# Altium PCB SBC_PCB.PcbDoc (part 1 of 4)
Units mm, origin at the board's own origin, x right, y up, seen from the top; angles counter-clockwise.
Board outline 85 x 56 mm, 8 copper layers (L1(SIG), L2(GND), L3(PWR), L4(SIG), L5(GND), L6(SIG), L7(GND), L8(SIG)), stack 1.593 mm thick; 597 components, 497 nets, 2394 pads, 229 vias.
Unrouted connection lines stored in the file: 1459.
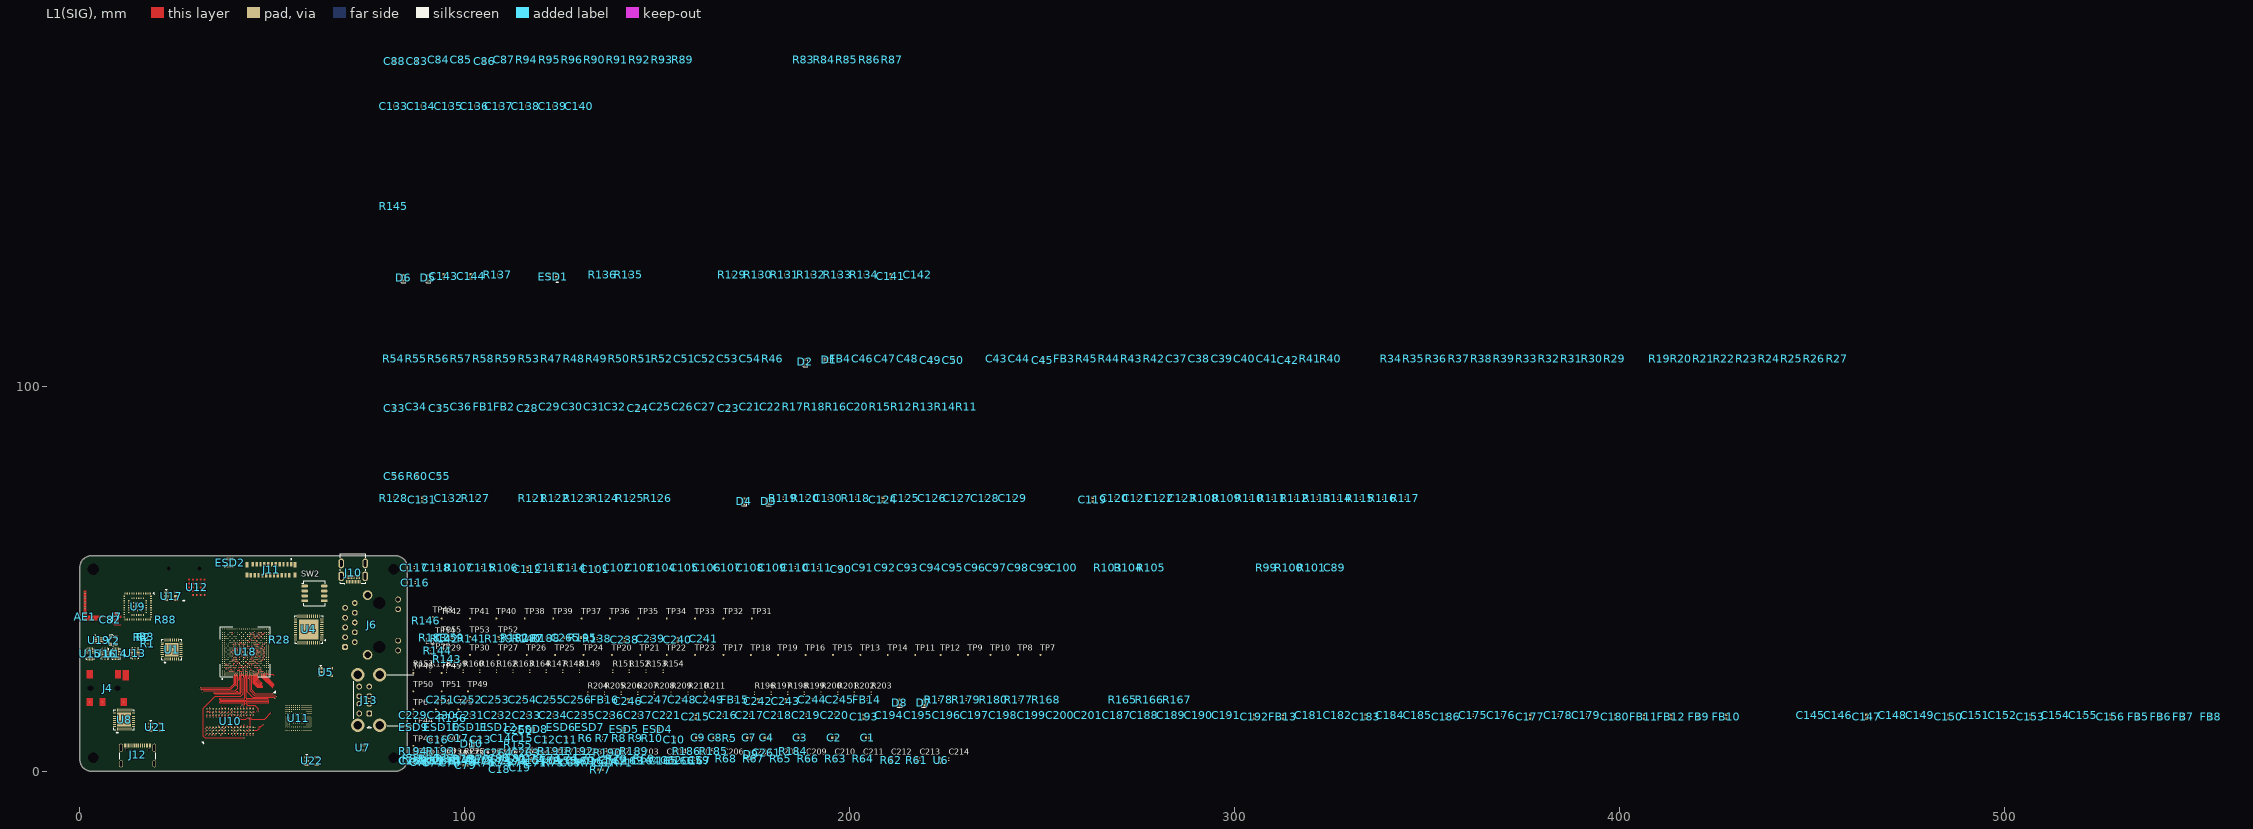
[diagram p0: L1(SIG) view]
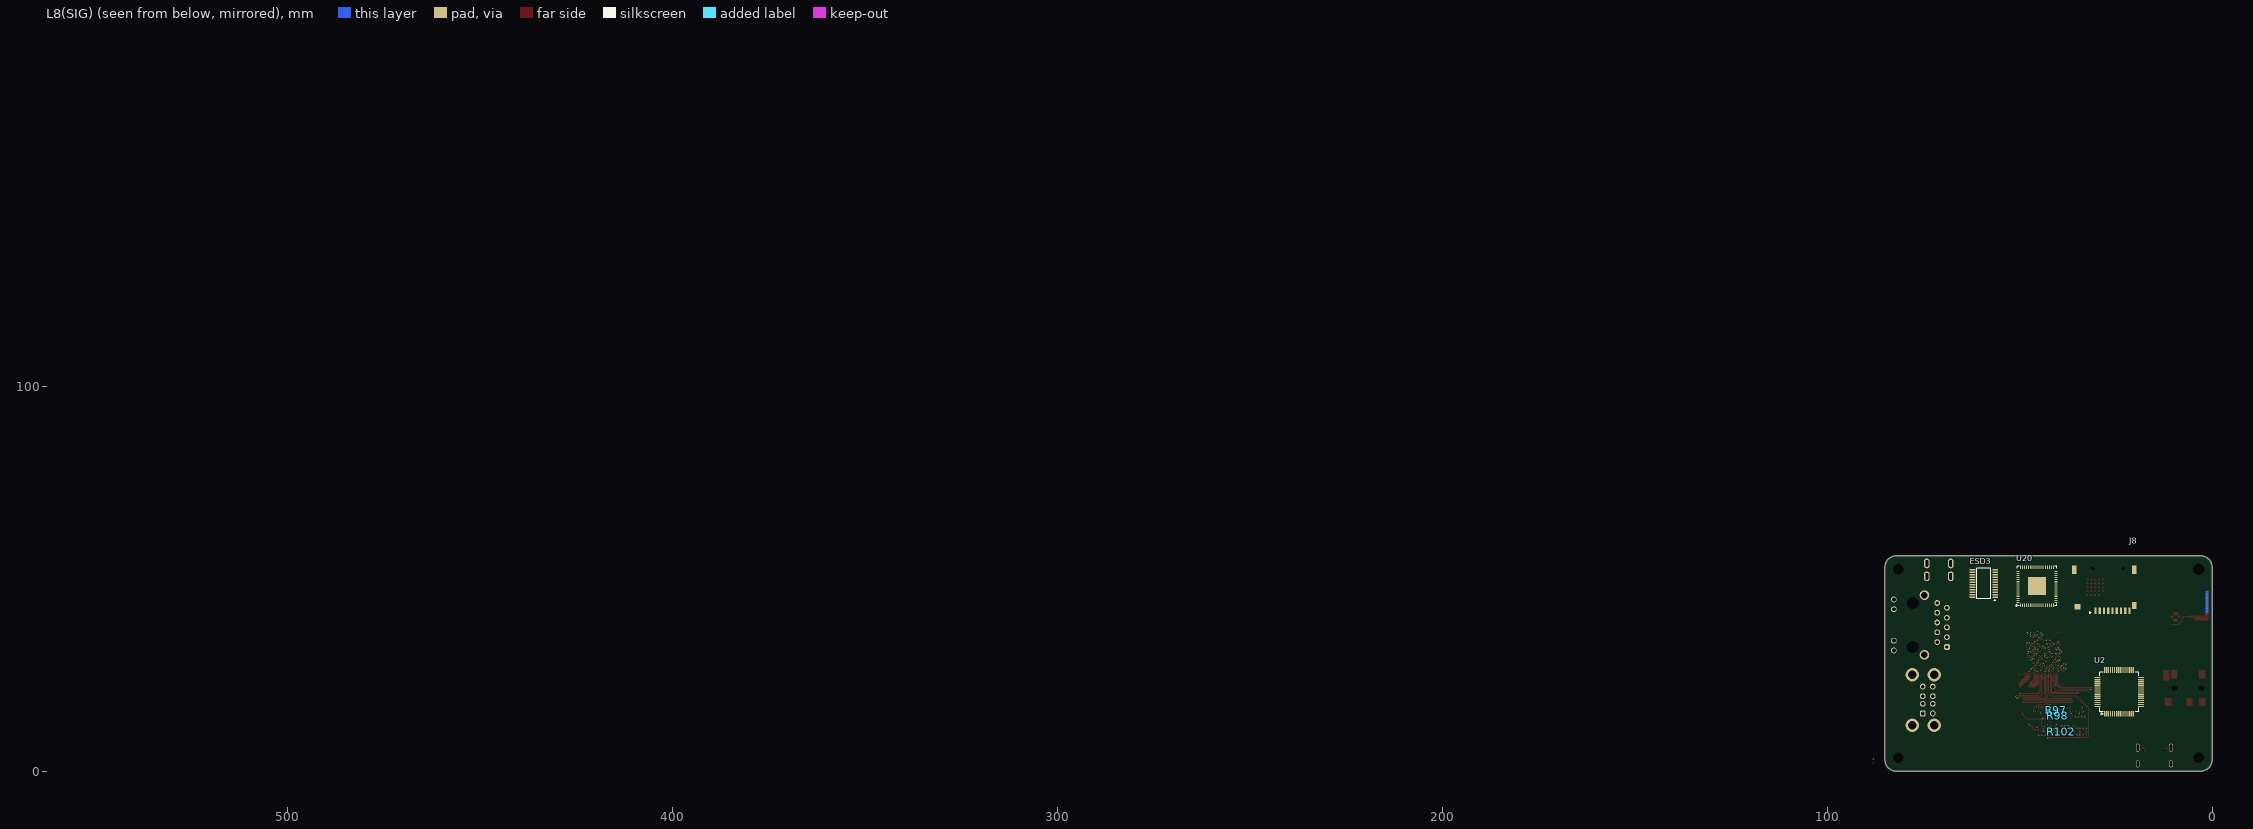
[diagram p1: L8(SIG) view, seen from below]
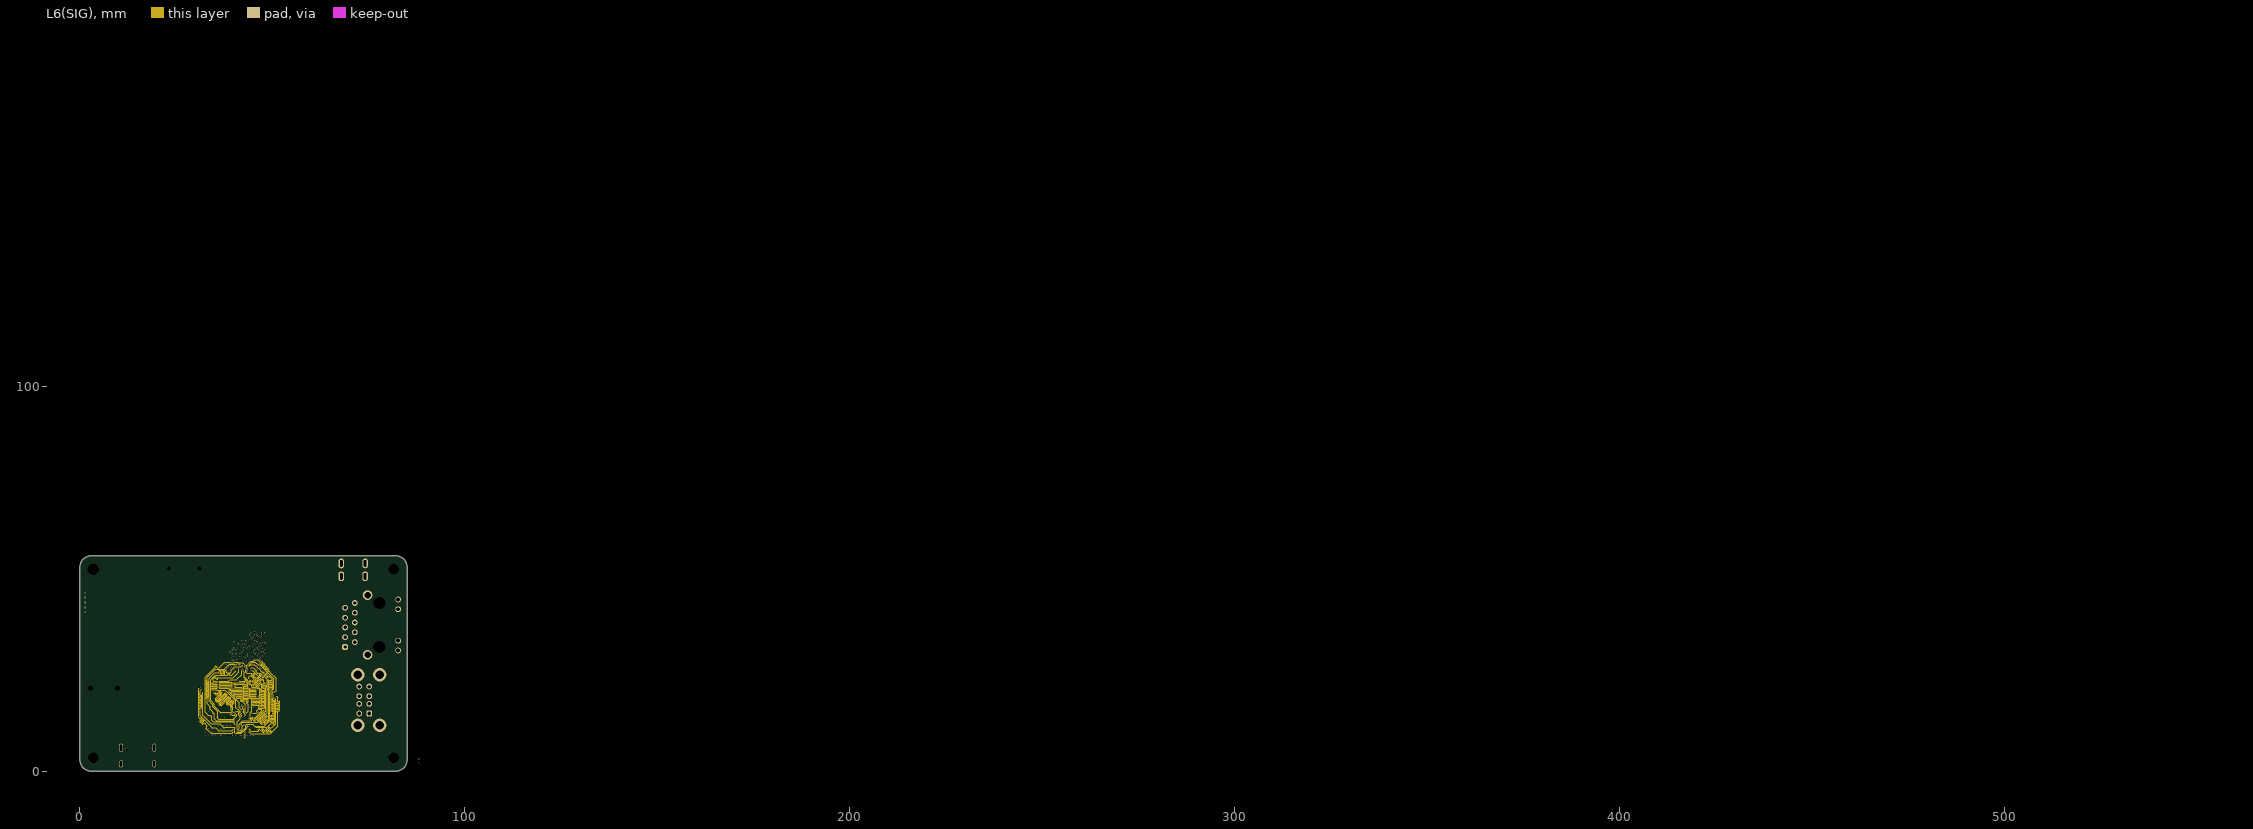
[diagram p2: L6(SIG)]

## Layer stack, top to bottom
Top Solder: solder mask 0.0305, Solder Resist, Dk 3.8
L1(SIG): signal copper 0.035
Dielectric 1: prepreg 0.069, 1080, Dk 3.91
L2(GND): signal copper 0.03
Dielectric 2: core 0.075, FR-4, Dk 3.99
L3(PWR): signal copper 0.03
Dielectric 3: prepreg 0.203, 7628, Dk 4.4
Dielectric 4: prepreg 0.218, 7628, Dk 4.4
Dielectric 5: prepreg 0.069, 1080, Dk 3.91
L4(SIG): signal copper 0.03
Dielectric 6: core 0.075, 7628, Dk 3.99
L5(GND): signal copper 0.03
Dielectric 7: prepreg 0.069, 1080, Dk 3.91
Dielectric 8: prepreg 0.218, 7628, Dk 4.4
Dielectric 9: prepreg 0.203, 7628, Dk 4.4
L6(SIG): signal copper 0.03
Dielectric 10: core 0.075, FR-4, Dk 3.99
L7(GND): signal copper 0.03
Dielectric 11: prepreg 0.069, 1080, Dk 3.91
L8(SIG): signal copper 0.035
Bottom Solder: solder mask 0.0305, Solder Resist, Dk 3.8

## Board outline
0,3 0,53 cw(c3,53) 3,56 82,56 cw(c82,53) 85,53 85,3 cw(c82,3) 82,0 3,0 cw(c3,3)

## Design rules (kind name [scope] priority, off if disabled: settings)
Clearance Clearance_BGA [TouchesRoom('ROOM_SOC') and IsTrack and OnLayer('L1(SIG)')] p1: gap=0.086 ignorepadtopadclearanceinfootprint=FALSE
Clearance ClearanceDDR4 [(InNetClass('DDR4_CTRL') OR InNetClass('DDR4_BYTE0') OR InNetClass('DDR4_BYTE1')) and not InAnyDifferentialPair] p2: gap=0.1 ignorepadtopadclearanceinfootprint=FALSE except(0.15: Arc-Arc Arc-Track Track-Track; 0.2: Via-Via)
Clearance [All] p3: gap=0.1 ignorepadtopadclearanceinfootprint=FALSE except(0.15: SMDPad-SMDPad; 0.2: Arc-Hole Track-Hole Via-Via)
DiffPairsRouting DiffPairsUnderBGA [TouchesRoom('ROOM_SOC')] p1: maxlimit=0.254 minlimit=0.086 mostfreqgap=0.086 toplayer_minwidth=0.076 toplayer_maxwidth=0.381 toplayer_prefwidth=0.076 midlayer1_minwidth=0.076 midlayer1_maxwidth=0.381 midlayer1_prefwidth=0.076 midlayer2_minwidth=0.076 midlayer2_maxwidth=0.381 midlayer2_prefwidth=0.076 midlayer5_minwidth=0.076 midlayer5_maxwidth=0.381 midlayer5_prefwidth=0.076 midlayer6_minwidth=0.076 midlayer6_maxwidth=0.381 midlayer6_prefwidth=0.076 midlayer7_minwidth=0.076 midlayer7_maxwidth=0.381 midlayer7_prefwidth=0.076 midlayer8_minwidth=0.076 midlayer8_maxwidth=0.381 midlayer8_prefwidth=0.076 bottomlayer_minwidth=0.076 bottomlayer_maxwidth=0.381 bottomlayer_prefwidth=0.076 maxuncoupledlength=12.7
DiffPairsRouting Diff85 [InDifferentialPairClass('DIFF85')] p2: maxlimit=0.305 minlimit=0.13 mostfreqgap=0.305 toplayer_maxgap=0.13 toplayer_prefgap=0.13 toplayer_minwidth=0.11 toplayer_maxwidth=0.11 toplayer_prefwidth=0.11 midlayer5_mingap=0.2 midlayer5_maxgap=0.2 midlayer5_prefgap=0.2 midlayer5_minwidth=0.1 midlayer5_maxwidth=0.1 midlayer5_prefwidth=0.1 midlayer7_mingap=0.2 midlayer7_maxgap=0.2 midlayer7_prefgap=0.2 midlayer7_minwidth=0.1 midlayer7_maxwidth=0.1 midlayer7_prefwidth=0.1 bottomlayer_maxgap=0.13 bottomlayer_prefgap=0.13 bottomlayer_minwidth=0.11 bottomlayer_maxwidth=0.11 bottomlayer_prefwidth=0.11 impedanceprofiledriven=TRUE impedanceprofileid={BB598DC0-6255-41A7-B6F5-3F376A6F4F4B} impedanceprofilevalue=85.000000 maxuncoupledlength=12.7
FanoutControl Fanout_BGA [IsBGA] p1: bgadir=Out bgaviamode=Centered fanoutstyle=BGA fanoutdirection=Alternating viagrid=0.025 // Fanout_BGA (Default Rule)
HoleSize [All] p1: absolutevalues=TRUE maxlimit=2.54 minlimit=0.2 maxpercent=80.000 minpercent=20.000
Length "Schematic Length Constraint_3" [InNetClass('DDR4_BYTE0')] p1: maxlimit=2540 minlimit=0 usedelayunits=TRUE mindelay=0.000000 maxdelay=500.000000
Length "Schematic Length Constraint_2" [InNetClass('DDR4_BYTE1')] p2: maxlimit=2540 minlimit=0 usedelayunits=TRUE mindelay=0.000000 maxdelay=500.000000
Length "Schematic Length Constraint" [InNetClass('DDR4_CTRL')] p3: maxlimit=2540 minlimit=0 usedelayunits=TRUE mindelay=0.000000 maxdelay=500.000000
MatchedLengths MatchLengths_xSignals_eMMC [InxSignalClass('xSignals_eMMC')] p1: tolerance=50 checknetsindiffpair=FALSE checkdiffpairvsdiffpair=TRUE checkxsignals=TRUE checkothers=TRUE usedelayunits=TRUE delaytolerance=8.000000
MatchedLengths "Schematic Matched Net Lengths" [InNetClass('DDR4_CTRL')] p2: tolerance=25.4 checknetsindiffpair=TRUE checkdiffpairvsdiffpair=FALSE checkxsignals=FALSE checkothers=FALSE usedelayunits=TRUE delaytolerance=0.400000
MatchedLengths "Schematic Matched Net Lengths_6" [InNetClass('DDR4_BYTE1')] p3: tolerance=25.4 checknetsindiffpair=FALSE checkdiffpairvsdiffpair=TRUE checkxsignals=TRUE checkothers=TRUE usedelayunits=TRUE delaytolerance=2.000000
MatchedLengths "Schematic Matched Net Lengths_5" [InNetClass('DDR4_BYTE0')] p4: tolerance=25.4 checknetsindiffpair=FALSE checkdiffpairvsdiffpair=TRUE checkxsignals=TRUE checkothers=TRUE usedelayunits=TRUE delaytolerance=2.000000
MatchedLengths "Schematic Matched Net Lengths_4" [InNetClass('DDR4_BYTE1')] p5: tolerance=25.4 checknetsindiffpair=TRUE checkdiffpairvsdiffpair=FALSE checkxsignals=FALSE checkothers=FALSE usedelayunits=TRUE delaytolerance=0.400000
MatchedLengths "Schematic Matched Net Lengths_3" [InNetClass('DDR4_BYTE0')] p6: tolerance=25.4 checknetsindiffpair=TRUE checkdiffpairvsdiffpair=FALSE checkxsignals=FALSE checkothers=FALSE usedelayunits=TRUE delaytolerance=0.400000
MatchedLengths "Schematic Matched Net Lengths_2" [InNetClass('DDR4_CTRL')] p7: tolerance=25.4 checknetsindiffpair=FALSE checkdiffpairvsdiffpair=TRUE checkxsignals=TRUE checkothers=TRUE usedelayunits=TRUE delaytolerance=3.000000
MinimumAnnularRing [All] p1: minimumring=0.1
MinimumSolderMaskSliver [All] p1: minsoldermaskwidth=0.1
PolygonConnect [All] p1: connectstyle=Relief reliefconductorwidth=0.254 reliefentries=4 polygonreliefangle="90 Angle" airgapwidth=0.254
RoomDefinition ROOM_SOC [InComponentClass('Room Definition1') vs False] p1: confinementstyle=ConfineIn formatcopy=TRUE lockcomponents=FALSE outline 36.079,24.359 36.079,37.921 49.922,37.921 49.922,24.359
RoutingVias [All] p1: holewidth=0.2 width=0.35 viastyle="Through Hole" minholewidth=0.2 minwidth=0.3 maxholewidth=0.5 maxwidth=1
SilkToSolderMaskClearance [IsPad] p1: minsilkscreentomaskgap=0.15 clearancetoexposedcopper=TRUE
SolderMaskExpansion [All] p1: expansion=0.05 istentingtop=FALSE
SupplyNets "Schematic Supply Nets_10" [InNet('+5V_SYS')] p1: voltage=0.000
SupplyNets "Schematic Supply Nets_32" [InNet('+3V3_CODEC')] p2: voltage=0.000
SupplyNets "Schematic Supply Nets_31" [InNet('+1V8_CODEC')] p3: voltage=0.000
SupplyNets "Schematic Supply Nets_30" [InNet('+1V8_HDMI')] p4: voltage=0.000
SupplyNets "Schematic Supply Nets_29" [InNet('+1V8_LDO')] p5: voltage=0.000
SupplyNets "Schematic Supply Nets_28" [InNet('+3V3_PMIC')] p6: voltage=0.000
SupplyNets "Schematic Supply Nets_27" [InNet('+1V8_REG')] p7: voltage=0.000
SupplyNets "Schematic Supply Nets_16" [InNet('+1V2_PMIC')] p8: voltage=0.000
SupplyNets "Schematic Supply Nets_23" [InNet('VDDR_CORE')] p9: voltage=0.000
SupplyNets "Schematic Supply Nets_20" [InNet('VDD_CORE')] p10: voltage=0.000
SupplyNets "Schematic Supply Nets_26" [InNet('DUSB_SH_GND')] p11: voltage=0.000
SupplyNets "Schematic Supply Nets_25" [InNet('+5V_DVBUS1')] p12: voltage=0.000
SupplyNets "Schematic Supply Nets_24" [InNet('+5V_DVBUS2')] p13: voltage=0.000
SupplyNets "Schematic Supply Nets_4" [InNet('+5V_VBUS')] p14: voltage=0.000
SupplyNets "Schematic Supply Nets_22" [InNet('UUSB_SH_GND')] p15: voltage=0.000
SupplyNets "Schematic Supply Nets_21" [InNet('ETH_SH_GND')] p16: voltage=0.000
SupplyNets "Schematic Supply Nets_19" [InNet('+1V2_HDMI')] p17: voltage=0.000
SupplyNets "Schematic Supply Nets_18" [InNet('+5V_HDMI')] p18: voltage=0.000
SupplyNets "Schematic Supply Nets_17" [InNet('+VIO_HDMI')] p19: voltage=0.000
SupplyNets "Schematic Supply Nets_15" [InNet('+3V3_uSD')] p20: voltage=0.000
SupplyNets "Schematic Supply Nets_14" [InNet('+VDD_uSD')] p21: voltage=0.000
SupplyNets "Schematic Supply Nets_13" [InNet('+3V3_WB')] p22: voltage=0.000
SupplyNets "Schematic Supply Nets_12" [InNet('+3V3_EMMC')] p23: voltage=0.000
SupplyNets "Schematic Supply Nets_11" [InNet('+1V8_EMMC')] p24: voltage=0.000
SupplyNets "Schematic Supply Nets_9" [InNet('+1V8_FTDI')] p25: voltage=0.000
SupplyNets "Schematic Supply Nets_8" [InNet('+1V2_DRAM')] p26: voltage=0.000
SupplyNets "Schematic Supply Nets_7" [InNet('+2V5_DRAM')] p27: voltage=0.000
SupplyNets "Schematic Supply Nets_6" [InNet('GND')] p28: voltage=0.000
SupplyNets "Schematic Supply Nets_5" [InNet('+3V3_ETH')] p29: voltage=0.000
SupplyNets "Schematic Supply Nets_3" [InNet('+1V8_CLK')] p30: voltage=0.000
SupplyNets "Schematic Supply Nets_2" [InNet('+3V3_FTDI')] p31: voltage=0.000
SupplyNets "Schematic Supply Nets_1" [InNet('+1V8_WB')] p32: voltage=0.000
SupplyNets "Schematic Supply Nets" [InNet('+1V8_ETH')] p33: voltage=0.000
Width WidthUnderBGA [TouchesRoom('ROOM_SOC')and OnLayer('L1(SIG)')] p1: maxlimit=0.5 minlimit=0.076 preferedwidth=0.076
Width Width45Ohm [InNetClass('SE45')] p2: maxlimit=0.254 minlimit=0.11 preferedwidth=0.254 toplayer_minwidth=0.12 toplayer_maxwidth=0.12 toplayer_prefwidth=0.12 midlayer5_maxwidth=0.11 midlayer5_prefwidth=0.11 midlayer7_maxwidth=0.11 midlayer7_prefwidth=0.11 bottomlayer_minwidth=0.12 bottomlayer_maxwidth=0.12 bottomlayer_prefwidth=0.12 impedanceprofiledriven=TRUE impedanceprofileid={D9E3666E-8F50-4501-A663-1746F2F0E132} impedanceprofilevalue=45.000000 minimp=50.000000 maximp=50.000000 favimp=50.000000
Width WidthDefault [All] p3: maxlimit=4 minlimit=0.076 preferedwidth=0.3
25 further rules are at their usual default settings.

## Classes and differential pairs
net class PWR: 1V8_REG_SW 1V8_REG_VOUT 3V3_REG_SW 3V3_REG_VOUT +1V2_PMIC +1V8_LDO +1V8_REG +2V5_DRAM +3V3_FTDI +3V3_PMIC +5V_DVBUS1 +5V_DVBUS2 +5V_SYS +5V_VBUS +VDD_uSD BUCK1_VOUT BUCK2_VOUT BUCK3_VOUT LDO1_VOUT LDO2_VOUT LDO3_VOUT LDO4_VOUT NetL4_1 NetL5_1 VDD1P8 VDD_CORE VDDA_1P8_CSIRX0 VDDA_1P8_OLDI0 VDDA_1P8_USB VDDA_CORE_CSIRX0 VDDA_CORE_USB VDDA_MCU VDDA_PLL0 VDDA_PLL1 VDDA_PLL2 VDDR_CORE
net class SE45: \DDR4_ACT \DDR4_CAS \DDR4_CS \DDR4_LDM \DDR4_RAS \DDR4_UDM \DDR4_WE DDR4_A0 DDR4_A1 DDR4_A2 DDR4_A3 DDR4_A4 DDR4_A5 DDR4_A6 DDR4_A7 DDR4_A8 DDR4_A9 DDR4_A10 DDR4_A11 DDR4_A12 DDR4_A13 DDR4_BA0 DDR4_BA1 DDR4_BG0 DDR4_CKE DDR4_CLK_N DDR4_CLK_P DDR4_DQ0 DDR4_DQ1 DDR4_DQ2 DDR4_DQ3 DDR4_DQ4 DDR4_DQ5 DDR4_DQ6 DDR4_DQ7 DDR4_DQ8 DDR4_DQ9 DDR4_DQ10 DDR4_DQ11 DDR4_DQ12 DDR4_DQ13 DDR4_DQ14 DDR4_DQ15 DDR4_LDQS_N DDR4_LDQS_P DDR4_ODT DDR4_PAR DDR4_UDQS_N DDR4_UDQS_P EMMC_CLK EMMC_CLK_R EMMC_CMD EMMC_DATA0 EMMC_DATA1 EMMC_DATA2 EMMC_DATA3 EMMC_DATA4 EMMC_DATA5 EMMC_DATA6 EMMC_DATA7
component class "SoC Config & GPIOs": R196 R197 R198 R199 R200 R201 R202 R203 R204 R205 R206 R207 R208 R209 R210 R211 SW2
component class "SoC Interfaces": R146 R147 R148 R149 R150 R151 R152 R153 R154 R155 R156 R157 R158 R159 R160 R161 R162 R163 R164
component class "USB Connector": C259 C261 C263 C264 C265 C266 C267 C268 D9 D10 ESD4 ESD5 ESD6 ESD7 ESD8 ESD9 ESD10 ESD11 ESD12 J12 J13 R182 R183 R184 R185 R186 R187 R188 R189 R190 R191 R192 R193 R194 R195 R212 R213 R214 R215 TP52 TP53 TP54 TP55 U21 U22 U23
component class CSI: J11
component class "HDMI TX": C242 C243 C244 C245 C246 C247 C248 C249 C250 C251 C252 C253 C254 C255 C256 D7 D8 FB14 FB15 FB16 R165 R166 R167 R168 R169 R170 R171 R172 R173 R174 R175 R176 R177 R178 R179 R180 TP49 TP50 TP51 U20
component class "HDMI Connector": C257 C258 ESD3 J10 R181
differential pair class DIFF85: DDR4_CLK DDR4_LDQS DDR4_UDQS DIFF85
component class "MicroSD Connector": C141 C142 C143 C144 D5 D6 ESD1 ESD2 J8 R129 R130 R131 R132 R133 R134 R135 R136 R137 TP45 TP46 U17
differential pair class DIFF100: ETH_MDI_TR0 ETH_MDI_TR1 ETH_MDI_TR2 ETH_MDI_TR3
net class DDR4_CTRL: \DDR4_ACT \DDR4_CAS \DDR4_CS \DDR4_RAS \DDR4_WE DDR4_A0 DDR4_A1 DDR4_A2 DDR4_A3 DDR4_A4 DDR4_A5 DDR4_A6 DDR4_A7 DDR4_A8 DDR4_A9 DDR4_A10 DDR4_A11 DDR4_A12 DDR4_A13 DDR4_BA0 DDR4_BA1 DDR4_BG0 DDR4_CKE DDR4_CLK_N DDR4_CLK_P DDR4_ODT DDR4_PAR
net class DDR4_BYTE1: \DDR4_UDM DDR4_DQ8 DDR4_DQ9 DDR4_DQ10 DDR4_DQ11 DDR4_DQ12 DDR4_DQ13 DDR4_DQ14 DDR4_DQ15 DDR4_UDQS_N DDR4_UDQS_P
net class DDR4_BYTE0: \DDR4_LDM DDR4_DQ0 DDR4_DQ1 DDR4_DQ2 DDR4_DQ3 DDR4_DQ4 DDR4_DQ5 DDR4_DQ6 DDR4_DQ7 DDR4_LDQS_N DDR4_LDQS_P
component class "WiFi BLE Module": AE1 C82 C83 C84 C85 C86 C87 C88 J7 L3 L6 L7 R83 R84 R85 R86 R87 R88 R89 R90 R91 R92 R93 R94 R95 R96 TP31 TP32 TP33 TP34 TP35 TP36 TP37 TP38 TP39 TP40 TP41 TP42 TP43 U9
component class "Voltage Translator": C133 C134 C135 C136 C137 C138 C139 C140 U13 U14 U15 U16
component class "SoC Power": C145 C146 C147 C148 C149 C150 C151 C152 C153 C154 C155 C156 C157 C158 C159 C160 C161 C162 C163 C164 C165 C166 C167 C168 C169 C170 C171 C172 C173 C174 C175 C176 C177 C178 C179 C180 C181 C182 C183 C184 C185 C186 C187 C188 C189 C190 C191 C192 C193 C194 C195 C196 C197 C198 C199 C200 C201 C202 C203 C204 C205 C206 C207 C208 C209 C210 C211 C212 C213 C214 C215 C216 C217 C218 C219 C220 C221 C222 C223 C224 C225 C226 C227 C228 C229 C230 C231 C232 C233 C234 C235 C236 C237 FB5 FB6 FB7 FB8 FB9 FB10 FB11 FB12 FB13 U18
component class "SoC DRAM": R145
component class PMIC: C59 C62 C67 C69 C71 C72 C73 C74 C75 C76 C77 C78 C79 C80 C81 R61 R62 R63 R64 R65 R66 R67 R68 R69 R70 R71 R72 R73 R74 R75 R76 R77 R78 R79 R80 R81 R82 TP7 TP8 TP9 TP10 TP11 TP12 TP13 TP14 TP15 TP16 TP17 TP18 TP19 TP20 TP21 TP22 TP23 TP24 TP25 TP26 TP27 TP28 TP29 TP30 U6 U7 U8
component class "Gigabit Ethernet PHY": C37 C38 C39 C40 C41 C42 C43 C44 C45 C46 C47 C48 C49 C50 C51 C52 C53 C54 D1 D2 FB3 FB4 R19 R20 R21 R22 R23 R24 R25 R26 R27 R28 R29 R30 R31 R32 R33 R34 R35 R36 R37 R38 R39 R40 R41 R42 R43 R44 R45 R46 R47 R48 R49 R50 R51 R52 R53 R54 R55 R56 R57 R58 R59 TP4 TP5 TP6 U4 U5
component class "FTDI Debug": C20 C21 C22 C23 C24 C25 C26 C27 C28 C29 C30 C31 C32 C33 C34 C35 C36 FB1 FB2 R11 R12 R13 R14 R15 R16 R17 R18 U2 U3 Y1
component class "Ethernet Magjack": C55 C56 J6 R60
component class "eMMC Flash Memory": C119 C120 C121 C122 C123 C124 C125 C126 C127 C128 C129 C130 C131 C132 D3 D4 R108 R109 R110 R111 R112 R113 R114 R115 R116 R117 R118 R119 R120 R121 R122 R123 R124 R125 R126 R127 R128 U11 U12
component class DRAM: C89 C90 C91 C92 C93 C94 C95 C96 C97 C98 C99 C100 C101 C102 C103 C104 C105 C106 C107 C108 C109 C110 C111 C112 C113 C114 C115 C116 C117 C118 R97 R98 R99 R100 R101 R102 R103 R104 R105 R106 R107 TP44 U10
component class Clock: C238 C239 C240 C241 R138 R139 R140 R141 R142 R143 R144 TP47 TP48 U19 Y2
component class "Audio Connector": J1 J2 J3 J4 J5
component class "Audio CODEC": C1 C2 C3 C4 C5 C6 C7 C8 C9 C10 C11 C12 C13 C14 C15 C16 C17 C18 C19 R1 R2 R3 R4 R5 R6 R7 R8 R9 R10 TP1 TP2 TP3 U1
differential pair DFP_USB2: +DFP_USB2_P -DFP_USB2_N
differential pair DFP_USB1: +DFP_USB1_P -DFP_USB1_N
differential pair DBG_USB: +DBG_USB_P -DBG_USB_N
differential pair HDMI_CONN_TXC: +HDMI_CONN_TXC_P -HDMI_CONN_TXC_N
differential pair HDMI_CONN_TX2: +HDMI_CONN_TX2_P -HDMI_CONN_TX2_N
differential pair HDMI_CONN_TX1: +HDMI_CONN_TX1_P -HDMI_CONN_TX1_N
differential pair HDMI_CONN_TX0: +HDMI_CONN_TX0_P -HDMI_CONN_TX0_N
differential pair ETH_MDI_TR3: +ETH_MDI_TR3_P -ETH_MDI_TR3_N
differential pair ETH_MDI_TR2: +ETH_MDI_TR2_P -ETH_MDI_TR2_N
differential pair ETH_MDI_TR1: +ETH_MDI_TR1_P -ETH_MDI_TR1_N
differential pair ETH_MDI_TR0: +ETH_MDI_TR0_P -ETH_MDI_TR0_N
differential pair DDR4_UDQS: +DDR4_UDQS_P -DDR4_UDQS_N
differential pair DDR4_LDQS: +DDR4_LDQS_P -DDR4_LDQS_N
differential pair DDR4_CLK: +DDR4_CLK_P -DDR4_CLK_N

## Components (designator, comment, footprint, x,y, rotation, side; value= is the part's Value field where it differs from the comment)
AE1 "Antenna_Chip" 2450AD14A5500001T 1.397,40.134 r90 top
C1 "1u" C0402 204.729,8.705 r0 top
C2 "1u" C0402 195.966,8.705 r0 top
C3 "1u" C0402 187.203,8.705 r0 top
C4 "1u" C0402 178.44,8.705 r0 top
C7 "1u" C0402 173.868,8.705 r0 top
C8 "1u" C0402 165.105,8.705 r0 top
C9 "1u" C0402 160.66,8.705 r0 top
C10 "1u" C0402 154.437,8.197 r90 top
C11 "4u7" C0402 126.497,8.197 r90 top
C12 "1u" C0402 120.909,8.197 r90 top
C13 "4u7" C0402 104.145,8.197 r90 top value=10u
C14 "C_0201" C0201 109.479,8.578 r90 top value=100n
C15 "C_0201" C0201 115.067,8.578 r90 top value=100n
C16 "4u7" C0402 92.969,8.197 r90 top value=10u
C17 "C_0201" C0201 98.303,8.578 r90 top value=100n
C18 "4u7" C0402 109.098,0.577 r90 top value=10u
C19 "C_0201" C0201 114.432,0.958 r90 top value=100n
C20 "C_0201" C0201 202.062,94.684 r90 top value=100n
C21 "C_0201" C0201 174.122,94.684 r90 top value=5pF
C22 "C_0201" C0201 179.456,94.684 r90 top value=5pF
C23 "C_0402" C0402 168.534,94.303 r90 top value=4u7
C24 "C_0402" C0402 145.039,94.303 r90 top value=4u7
C25 "C_0201" C0201 150.754,94.684 r90 top value=100n
C26 "C_0201" C0201 156.596,94.684 r90 top value=100n
C27 "C_0201" C0201 162.438,94.684 r90 top value=100n
C28 "C_0402" C0402 116.337,94.303 r90 top value=4u7
C29 "C_0201" C0201 122.052,94.684 r90 top value=100n
C30 "C_0201" C0201 127.894,94.684 r90 top value=100n
C31 "C_0201" C0201 133.736,94.684 r90 top value=100n
C32 "C_0201" C0201 139.07,94.684 r90 top value=100n
C33 "C_0402" C0402 81.793,94.303 r90 top value=4u7
C34 "C_0201" C0201 87.381,94.684 r90 top value=100n
C35 "C_0402" C0402 93.477,94.303 r90 top value=4u7
C36 "C_0201" C0201 99.065,94.684 r90 top value=100n
C37 "C_0201" C0201 284.993,107.13 r90 top value=100n
C38 "C_0201" C0201 290.835,107.13 r90 top value=100n
C39 "C_0201" C0201 296.804,107.13 r90 top value=100n
C40 "C_0201" C0201 302.646,107.13 r90 top value=100n
C41 "C_0201" C0201 308.488,107.13 r90 top value=100n
C42 "4u7" C0402 313.949,106.749 r90 top value=10u
C43 "C_0201" C0201 238.257,107.13 r90 top value=100n
C44 "C_0201" C0201 244.099,107.13 r90 top value=100n
C45 "4u7" C0402 250.195,106.749 r90 top value=10u
C46 "C_0201" C0201 203.332,107.13 r90 top value=100n
C47 "C_0201" C0201 209.174,107.13 r90 top value=100n
C48 "C_0201" C0201 215.016,107.13 r90 top value=100n
C49 "4u7" C0402 221.112,106.749 r90 top value=10u
C50 "4u7" C0402 226.954,106.749 r90 top value=10u
C51 "C_0201" C0201 157.104,107.13 r90 top value=100n
C52 "C_0201" C0201 162.438,107.13 r90 top value=100n
C53 "C_0201" C0201 168.28,107.13 r90 top value=100n
C54 "C_0201" C0201 174.122,107.13 r90 top value=100n
C55 "C_0402" C0402 93.477,76.65 r90 top value=100nF
C56 "C_0402" C0402 81.793,76.65 r90 top value=0R
C59 "C_0402" C0402 160.914,2.863 r90 top value=100nF
C62 "C_0402" C0402 153.802,2.863 r90 top value=100nF
C67 "C_0402" C0402 136.403,2.228 r0 top value=100n
C69 "C_0402" C0402 127.513,2.228 r0 top value=100n
C71 "C_0402" C0402 118.496,2.228 r0 top value=100n
C72 "C_0402" C0402 117.861,3.371 r0 top value=2.2uF
C73 "C_0402" C0402 122.306,3.371 r0 top value=2.2uF
C74 "C_0402" C0402 126.751,3.371 r0 top value=2.2uF
C75 "C_0402" C0402 131.323,3.371 r0 top value=2.2uF
C76 "C_0402" C0402 88.519,2.286 r0 top value=2.2uF
C77 "C_0402" C0402 91.826,2.228 r0 top value=2.2uF
C78 "C_0402" C0402 96.271,2.228 r0 top value=2.2uF
C79 "C_0402" C0402 100.195,1.524 r0 top value=2.2uF
C80 "C_0402" C0402 108.971,3.371 r0 top value=2.2uF
C81 "C_0402" C0402 113.416,3.371 r0 top value=2.2uF
C82 "C_0201" C0201 7.874,39.391 r90 top value=4p
C83 "4u7" C0402 87.635,184.473 r90 top value=10u
C84 "C_0201" C0201 93.223,184.854 r90 top value=100n
C85 "C_0201" C0201 99.065,184.854 r90 top value=100n
C86 "4u7" C0402 105.161,184.473 r90 top value=10u
C87 "C_0201" C0201 110.241,184.854 r90 top value=100n
C88 "4u7" C0402 81.793,184.473 r90 top value=10u
C89 "C_0201" C0201 326.014,52.901 r90 top value=10n
C90 "4u7" C0402 197.744,52.52 r90 top value=10u
C91 "C_0201" C0201 203.332,52.901 r90 top value=100n
C92 "C_0201" C0201 209.174,52.901 r90 top value=100n
C93 "C_0201" C0201 215.016,52.901 r90 top value=100n
C94 "C_0201" C0201 220.985,52.901 r90 top value=100n
C95 "C_0201" C0201 226.827,52.901 r90 top value=100n
C96 "C_0201" C0201 232.669,52.901 r90 top value=100n
C97 "C_0201" C0201 238.003,52.901 r90 top value=100n
C98 "C_0201" C0201 243.845,52.901 r90 top value=100n
C99 "C_0201" C0201 249.687,52.901 r90 top value=100n
C100 "C_0201" C0201 255.529,52.901 r90 top value=100n
C101 "4u7" C0402 133.863,52.52 r90 top value=10u
C102 "C_0201" C0201 139.578,52.901 r90 top value=100n
C103 "C_0201" C0201 145.42,52.901 r90 top value=100n
C104 "C_0201" C0201 151.262,52.901 r90 top value=100n
C105 "C_0201" C0201 157.104,52.901 r90 top value=100n
C106 "C_0201" C0201 162.946,52.901 r90 top value=100n
C107 "C_0201" C0201 168.28,52.901 r90 top value=100n
C108 "C_0201" C0201 174.122,52.901 r90 top value=100n
C109 "C_0201" C0201 179.964,52.901 r90 top value=100n
C110 "C_0201" C0201 185.806,52.901 r90 top value=100n
C111 "C_0201" C0201 191.648,52.901 r90 top value=100n
C112 "4u7" C0402 116.337,52.52 r90 top value=10u
C113 "C_0201" C0201 122.052,52.901 r90 top value=100n
C114 "C_0201" C0201 127.894,52.901 r90 top value=100n
C115 "C_0201" C0201 104.399,52.901 r90 top value=100n
C116 "C_0201" C0201 87.122,49.022 r90 top value=100n
C117 "C_0201" C0201 86.873,52.901 r90 top value=100n
C118 "C_0201" C0201 92.715,52.901 r90 top value=100n
C119 "4u7" C0402 263.149,70.554 r90 top value=10u
C120 "C_0201" C0201 268.864,70.935 r90 top value=100n
C121 "C_0201" C0201 274.706,70.935 r90 top value=100n
C122 "C_0201" C0201 280.548,70.935 r90 top value=100n
C123 "C_0201" C0201 286.39,70.935 r90 top value=100n
C124 "4u7" C0402 208.666,70.554 r90 top value=10u
C125 "C_0201" C0201 214.381,70.935 r90 top value=100n
C126 "C_0201" C0201 221.493,70.935 r90 top value=100n
C127 "C_0201" C0201 228.097,70.935 r90 top value=100n
C128 "C_0201" C0201 235.209,70.935 r90 top value=100n
C129 "C_0201" C0201 242.321,70.935 r90 top value=100n
C130 "C_0201" C0201 194.442,70.935 r90 top value=100n
C131 "4u7" C0402 88.905,70.554 r90 top value=10u
C132 "C_0201" C0201 95.763,70.935 r90 top value=100n
C133 "C_0201" C0201 81.539,172.789 r90 top value=100n
C134 "C_0201" C0201 88.651,172.789 r90 top value=100n
C135 "C_0201" C0201 95.763,172.789 r90 top value=100n
C136 "C_0201" C0201 102.621,172.789 r90 top value=100n
C137 "C_0201" C0201 108.971,172.789 r90 top value=100n
C138 "C_0201" C0201 115.829,172.789 r90 top value=100n
C139 "C_0201" C0201 122.814,172.789 r90 top value=100n
C140 "C_0201" C0201 129.672,172.789 r90 top value=100n
C141 "4u7" C0402 210.698,128.593 r90 top value=10u
C142 "C_0201" C0201 217.683,128.974 r90 top value=100n
C143 "4u7" C0402 94.493,128.593 r90 top value=10u
C144 "4u7" C0402 101.605,128.593 r90 top value=10u
C145 "C_0201" C0201 449.712,14.547 r90 top value=10n
C146 "C_0201" C0201 456.824,14.547 r90 top value=100n
C147 "4u7" C0402 464.19,14.166 r90 top
C148 "C_0201" C0201 471.048,14.547 r90 top value=10n
C149 "C_0201" C0201 478.16,14.547 r90 top value=100n
C150 "4u7" C0402 485.526,14.166 r90 top
C151 "C_0201" C0201 492.384,14.547 r90 top value=10n
C152 "C_0201" C0201 499.623,14.547 r90 top value=100n
C153 "4u7" C0402 506.862,14.166 r90 top
C154 "C_0201" C0201 513.339,14.547 r90 top value=10n
C155 "C_0201" C0201 520.451,14.547 r90 top value=100n
C156 "4u7" C0402 527.69,14.166 r90 top
C157 "4u7" C0402 117.607,2.863 r0 top value=10u
C158 "C_0201" C0201 121.29,2.736 r90 top value=100n
C159 "C_0201" C0201 125.608,2.736 r90 top value=100n
C160 "C_0201" C0201 129.926,2.736 r90 top value=100n
C161 "C_0201" C0201 134.244,2.736 r90 top value=100n
C162 "C_0201" C0201 138.562,2.736 r90 top value=100n
C163 "C_0201" C0201 142.88,2.736 r90 top value=100n
C164 "C_0201" C0201 147.198,2.736 r90 top value=100n
C165 "C_0201" C0201 151.643,2.736 r90 top value=100n
C166 "C_0201" C0201 155.961,2.736 r90 top value=100n
C167 "C_0201" C0201 160.279,2.736 r90 top value=100n
C168 "C_0201" C0201 86.619,2.736 r90 top value=100n
C169 "C_0201" C0201 90.937,2.736 r90 top value=100n
C170 "C_0201" C0201 95.255,2.736 r90 top value=100n
C171 "C_0201" C0201 99.573,2.736 r90 top value=100n
C172 "C_0201" C0201 103.891,2.736 r90 top value=100n
C173 "C_0201" C0201 108.209,2.736 r90 top value=100n
C174 "C_0201" C0201 112.527,2.736 r90 top value=100n
C175 "C_0201" C0201 361.955,14.547 r90 top value=10n
C176 "C_0201" C0201 369.321,14.547 r90 top value=100n
C177 "4u7" C0402 376.814,14.166 r90 top
C178 "C_0201" C0201 384.053,14.547 r90 top value=10n
C179 "C_0201" C0201 391.419,14.547 r90 top value=100n
C180 "4u7" C0402 398.912,14.166 r90 top
C181 "C_0201" C0201 319.41,14.547 r90 top value=10n
C182 "C_0201" C0201 326.776,14.547 r90 top value=100n
C183 "4u7" C0402 334.142,14.166 r90 top
C184 "C_0201" C0201 340.492,14.547 r90 top value=10n
C185 "C_0201" C0201 347.604,14.547 r90 top value=100n
C186 "4u7" C0402 354.97,14.166 r90 top
C187 "C_0201" C0201 269.372,14.547 r90 top value=100n
C188 "C_0201" C0201 276.484,14.547 r90 top value=100n
C189 "C_0201" C0201 283.596,14.547 r90 top value=100n
C190 "C_0201" C0201 290.708,14.547 r90 top value=10n
C191 "C_0201" C0201 297.82,14.547 r90 top value=100n
C192 "4u7" C0402 305.186,14.166 r90 top
C193 "4u7" C0402 203.713,14.166 r90 top value=10u
C194 "C_0201" C0201 210.317,14.547 r90 top value=100n
C195 "C_0201" C0201 217.81,14.547 r90 top value=100n
C196 "C_0201" C0201 225.176,14.547 r90 top value=100n
C197 "C_0201" C0201 232.542,14.547 r90 top value=100n
C198 "C_0201" C0201 239.908,14.547 r90 top value=100n
C199 "C_0201" C0201 247.274,14.547 r90 top value=100n
C200 "C_0201" C0201 254.64,14.547 r90 top value=100n
C201 "C_0201" C0201 262.006,14.547 r90 top value=100n
C202 "4u7" C0402 137.8,2.736 r90 top
C203 "C_0201" C0201 145.039,3.117 r90 top value=100n
C204 "C_0201" C0201 152.405,3.117 r90 top value=100n
C205 "C_0201" C0201 159.771,3.117 r90 top value=100n
C206 "C_0201" C0201 167.137,3.117 r90 top value=100n
C207 "C_0201" C0201 174.503,3.117 r90 top value=100n
C208 "C_0201" C0201 181.361,3.117 r90 top value=100n
C209 "C_0201" C0201 188.727,3.117 r90 top value=100n
C210 "C_0201" C0201 196.093,3.117 r90 top value=100n
C211 "C_0201" C0201 203.459,3.117 r90 top value=100n
C212 "C_0201" C0201 210.825,3.117 r90 top value=100n
C213 "C_0201" C0201 218.191,3.117 r90 top value=100n
C214 "C_0201" C0201 225.684,3.117 r90 top value=100n
C215 "4u7" C0402 160.025,14.166 r90 top value=10u
C216 "C_0201" C0201 167.137,14.547 r90 top value=100n
C217 "C_0201" C0201 173.995,14.547 r90 top value=100n
C218 "C_0201" C0201 181.361,14.547 r90 top value=100n
C219 "C_0201" C0201 188.727,14.547 r90 top value=100n
C220 "C_0201" C0201 196.093,14.547 r90 top value=100n
C221 "C_0201" C0201 152.405,14.547 r90 top value=100n
C222 "4u7" C0402 86.746,2.736 r90 top
C223 "C_0201" C0201 93.985,3.117 r90 top value=100n
C224 "4u7" C0402 101.478,2.736 r90 top
C225 "C_0201" C0201 108.209,3.117 r90 top value=100n
C226 "C_0201" C0201 115.575,3.117 r90 top value=100n
C227 "C_0201" C0201 122.941,3.117 r90 top value=100n
C228 "C_0201" C0201 130.307,3.117 r90 top value=100n
C229 "C_0201" C0201 86.619,14.547 r90 top value=1u
C230 "C_0201" C0201 93.985,14.547 r90 top value=1u
C231 "C_0201" C0201 101.351,14.547 r90 top value=1u
C232 "C_0201" C0201 108.717,14.547 r90 top value=1u
C233 "C_0201" C0201 116.083,14.547 r90 top value=1u
C234 "C_0201" C0201 122.941,14.547 r90 top value=1u
C235 "C_0201" C0201 130.307,14.547 r90 top value=1u
C236 "C_0201" C0201 137.673,14.547 r90 top value=1u
C237 "C_0201" C0201 145.039,14.547 r90 top value=1u
C238 "4u7" C0402 141.61,34.105 r90 top value=10u
C239 "C_0201" C0201 148.341,34.486 r90 top value=100n
C240 "4u7" C0402 155.326,34.105 r90 top value=10u
C241 "C_0201" C0201 162.057,34.486 r90 top value=100n
C242 "4u7" C0402 176.281,18.23 r90 top value=10u
C243 "4u7" C0402 183.393,18.23 r90 top value=10u
C244 "C_0201" C0201 190.251,18.611 r90 top value=100n
C245 "C_0201" C0201 197.363,18.611 r90 top value=100n
C246 "4u7" C0402 142.499,18.23 r90 top value=10u
C247 "C_0201" C0201 149.357,18.611 r90 top value=100n
C248 "C_0201" C0201 156.469,18.611 r90 top value=100n
C249 "C_0201" C0201 163.581,18.611 r90 top value=100n
C250 "4u7" C0402 114.051,10.61 r90 top value=10u
C251 "C_0201" C0201 93.731,18.611 r90 top value=100n
C252 "C_0201" C0201 100.843,18.611 r90 top value=100n
C253 "C_0201" C0201 107.955,18.611 r90 top value=100n
C254 "C_0201" C0201 115.067,18.611 r90 top value=100n
C255 "C_0201" C0201 122.179,18.611 r90 top value=100n
C256 "C_0201" C0201 129.291,18.611 r90 top value=100n
C257 "4u7" C0402 86.746,2.736 r90 top value=10u
C258 "4u7" C0402 93.858,2.736 r90 top value=10u
C259 "4u7" C0402 96.271,34.74 r0 top value=10u
C261 "4u7" C0402 178.44,4.768 r90 top value=10u
C263 "4u7" C0402 115.829,4.768 r90 top value=10u
C264 "C_0402" C0402 108.717,4.768 r90 top value=0R
C265 "C_0402" C0402 126.243,34.74 r0 top value=0R
C266 "4u7" C0402 114.178,2.863 r90 top value=1u
C267 "4u7" C0402 121.544,2.863 r90 top value=10u
C268 "C_0402" C0402 92.588,2.863 r90 top value=1n
D1 "D_Filled" D_SOD-523 194.696,106.876 r0 top
D2 "D_Filled" D_SOD-523 188.473,106.368 r90 top
D3 "D_Filled" D_SOD-523 178.948,70.173 r90 top value=BAT54TS_R1_00001
D4 "D_Filled" D_SOD-523 172.598,70.173 r90 top value=BAT54TS_R1_00001
D5 "D_Filled" D_SOD-523 90.556,128.212 r90 top value=BAT54TS_R1_00001
D6 "D_Filled" D_SOD-523 84.079,128.212 r90 top value=BAT54TS_R1_00001
D7 "D_Filled" D_SOD-523 219.334,17.849 r90 top value=BAT54TS_R1_00001
D8 "D_Filled" D_SOD-523 212.984,17.849 r90 top value=BAT54TS_R1_00001
D9 "D_Filled" D_SOD-523 174.376,4.387 r90 top value=BAT54TS_R1_00001
D10 "D_Filled" D_SOD-523 101.854,7.177 r90 top value=BAT54TS_R1_00001
ESD1 "TPESD05R4C6" TPESD05R4C6 122.941,128.466 r90 top
ESD2 "TPESD05R4C6" TPESD05R4C6 38.989,54.229 r0 top
ESD3 "TPD12S016PWR" TSOP65P640X120-24N 59.309,48.768 r0 bottom
ESD4 "ESD" D_SOD-923 150.119,10.864 r90 top value=DF2S8.2FS,L3M
ESD5 "ESD" D_SOD-923 141.356,10.864 r90 top value=DF2S8.2FS,L3M
ESD6 "D_Filled" ESD341 125.1,11.372 r90 top value=ESD341DPLR
ESD7 "D_Filled" ESD341 132.466,11.372 r90 top value=ESD341DPLR
ESD8 "ESD" D_SOD-923 117.734,10.864 r90 top value=DF2S8.2FS,L3M
ESD9 "D_Filled" ESD341 86.746,11.372 r90 top value=ESD341DPLR
ESD10 "D_Filled" ESD341 94.112,11.372 r90 top value=ESD341DPLR
ESD11 "D_Filled" ESD341 101.478,11.372 r90 top value=ESD341DPLR
ESD12 "D_Filled" ESD341 108.844,11.372 r90 top value=ESD341DPLR
FB1 "FB_0201" FB0201 104.907,94.684 r90 top value=100R
FB2 "FB_0201" FB0201 110.241,94.684 r90 top value=100R
FB3 "FB_0201" FB0201 255.783,107.13 r90 top value=100R
FB4 "FB_0201" FB0201 197.49,107.13 r90 top value=100R
FB5 "FB_0402" FB0402 534.802,14.166 r90 top
FB6 "FB_0402" FB0402 540.644,14.166 r90 top
FB7 "FB_0402" FB0402 546.486,14.166 r90 top
FB8 "FB_0402" FB0402 553.598,14.166 r90 top
FB9 "FB_0402" FB0402 420.629,14.166 r90 top
FB10 "FB_0402" FB0402 427.741,14.166 r90 top
FB11 "FB_0402" FB0402 406.278,14.166 r90 top
FB12 "FB_0402" FB0402 413.39,14.166 r90 top
FB13 "FB_0402" FB0402 312.552,14.166 r90 top
FB14 "FB_0201" FB0201 204.475,18.611 r90 top value=0R
FB15 "FB_0201" FB0201 170.185,18.611 r90 top value=0R
FB16 "FB_0201" FB0201 136.403,18.611 r90 top value=0R
J4 "AudioJack4_SwitchTR1" PJ-342 0.379,21.59 r0 top value=PJ-342
J6 "HR911130A" HR911130A 77.977,38 r270 top
J7 "MM8030-2610RK0" COAXIAL-SWG 9.525,40.132 r90 top
J8 "MSD-1-A" MSD-1-A 27.94,49.53 r0 bottom
J10 "HDMI_D_1.4" HDMI_Micro-D_Molex_46765-1xxx 71,54 r180 top
J11 "Conn_01x22" 5019512230 49.657,52.07 r180 top
J12 "USB_C_Receptacle_USB2.0_16P" USB_C_Receptacle_GCT_USB4105-xx-A_16P_TopMnt_Horizontal 15,3 r0 top value=USB4105-GF-A
J13 "USB_A_Stacked" USB_A_CUI_UJ2-ADH-TH_Horizontal_Stacked 75.167,15 r180 top value="AF SS-JB17.6"
L6 "L" FB0201 89.937,32.004 r0 top
L7 "L" FB0201 90.937,31.692 r90 top
R1 "0201" R0201 17.653,33.147 r0 top value=22R
R2 "0201" R0201 16.616,34.798 r90 top value=22R
R3 "0201" R0201 17.505,34.925 r90 top value=22R
R4 "0201" R0201 15.854,34.798 r90 top value=22R
R5 "0201" R0201 168.788,8.578 r90 top value=10k
R6 "0201" R0201 131.45,8.578 r90 top value=10k
R7 "0201" R0201 135.768,8.578 r90 top value=10k
R8 "0201" R0201 140.086,8.578 r90 top value=10k
R9 "0201" R0201 144.404,8.578 r90 top value=10k
R10 "0201" R0201 148.722,8.578 r90 top value=10k
R11 "0201" R0201 230.383,94.684 r90 top value=10k
R12 "0201" R0201 213.492,94.684 r90 top value=10k
R13 "0201" R0201 219.207,94.684 r90 top value=10k
R14 "0201" R0201 224.795,94.684 r90 top value=10k
R15 "0201" R0201 207.904,94.684 r90 top value=10k
R16 "0201" R0201 196.474,94.684 r90 top value=2k
R17 "0201" R0201 185.298,94.684 r90 top value=22R
R18 "0201" R0201 190.886,94.684 r90 top value=10k
R19 "0201" R0201 410.469,107.13 r90 top value=10k
R20 "0201" R0201 416.057,107.13 r90 top value=10k
R21 "0201" R0201 421.899,107.13 r90 top value=10k
R22 "0201" R0201 427.233,107.13 r90 top value=10k
R23 "0201" R0201 433.075,107.13 r90 top value=10k
R24 "0201" R0201 438.917,107.13 r90 top value=10k
R25 "0201" R0201 444.759,107.13 r90 top value=4k7
R26 "0201" R0201 450.601,107.13 r90 top value=10k
R27 "0201" R0201 456.57,107.13 r90 top value=1k
R28 "0201" R0201 51.943,34.163 r0 top value=22R
R29 "0201" R0201 398.785,107.13 r90 top value=22R
R30 "0201" R0201 392.943,107.13 r90 top value=22R
R31 "0201" R0201 387.609,107.13 r90 top value=22R
R32 "0201" R0201 381.767,107.13 r90 top value=22R
R33 "0201" R0201 375.925,107.13 r90 top value=22R
R34 "0201" R0201 340.746,107.13 r90 top value=1k
R35 "0201" R0201 346.588,107.13 r90 top value=1k
R36 "0201" R0201 352.43,107.13 r90 top value=1k
R37 "0201" R0201 358.399,107.13 r90 top value=1k
R38 "0201" R0201 364.241,107.13 r90 top value=1k
R39 "0201" R0201 370.083,107.13 r90 top value=1k
R40 "0201" R0201 324.998,107.13 r90 top value=22R
R41 "0201" R0201 319.664,107.13 r90 top value=22R
R42 "0201" R0201 279.151,107.13 r90 top value=22R
R43 "0201" R0201 273.309,107.13 r90 top value=22R
R44 "0201" R0201 267.467,107.13 r90 top value=22R
R45 "0201" R0201 261.625,107.13 r90 top value=22R
R46 "0201" R0201 179.964,107.13 r90 top value=6k01
R47 "0201" R0201 122.56,107.13 r90 top value=DNP
R48 "0201" R0201 128.402,107.13 r90 top value=DNP
R49 "0201" R0201 134.244,107.13 r90 top value=10k
R50 "0201" R0201 140.086,107.13 r90 top value=10k
R51 "0201" R0201 145.928,107.13 r90 top value=10k
R52 "0201" R0201 151.262,107.13 r90 top value=10k
R53 "0201" R0201 116.718,107.13 r90 top value=22R
R54 "0201" R0201 81.539,107.13 r90 top value=1k
R55 "0201" R0201 87.381,107.13 r90 top value=1k
R56 "0201" R0201 93.223,107.13 r90 top value=1k
R57 "0201" R0201 99.065,107.13 r90 top value=1k
R58 "0201" R0201 104.907,107.13 r90 top value=1k
R59 "0201" R0201 110.749,107.13 r90 top value=DNP
R60 "0402" R0402 87.635,76.65 r90 top value=0R
R61 "0402" R0402 217.429,2.863 r90 top value=0R
R62 "0402" R0402 210.825,2.863 r90 top value=0R
R63 "0201" R0201 196.347,3.244 r90 top value=10k
R64 "0201" R0201 203.459,3.244 r90 top value=10R
R65 "0201" R0201 182.123,3.244 r90 top value=10k
R66 "0201" R0201 189.235,3.244 r90 top value=10R
R67 "0201" R0201 175.011,3.244 r90 top value=200k
R68 "0201" R0201 167.899,3.244 r90 top value=200k
R69 "0201" R0201 146.563,3.244 r90 top value=44k2
R70 "0201" R0201 139.451,3.244 r90 top value=100k
R71 "0402" R0402 140.848,2.228 r0 top value=0R
R72 "0402" R0402 131.958,2.228 r0 top value=0R
R73 "0402" R0402 123.068,2.228 r0 top value=0R
R74 "0402" R0402 114.051,2.228 r0 top value=0R
R75 "0402" R0402 109.606,2.228 r0 top value=0R
R76 "0402" R0402 105.161,2.228 r0 top value=0R
R77 "0402" R0402 135.255,0.381 r0 top value=0R
R78 "0201" R0201 99.573,3.244 r90 top value=10k
R79 "0201" R0201 103.891,3.244 r90 top value=10k
R80 "0201" R0201 90.937,3.244 r90 top value=10k
R81 "0201" R0201 95.255,3.244 r90 top value=10k
R82 "0201" R0201 86.619,3.244 r90 top value=100k
R83 "0201" R0201 188.092,184.854 r90 top value=47k
R84 "0201" R0201 193.426,184.854 r90 top value=47k
R85 "0201" R0201 199.268,184.854 r90 top value=47k
R86 "0201" R0201 205.237,184.854 r90 top value=47k
R87 "0201" R0201 211.079,184.854 r90 top value=47k
R88 "0201" R0201 22.352,39.37 r180 top value=22R
R89 "0201" R0201 156.596,184.854 r90 top value=22R
R90 "0201" R0201 133.736,184.854 r90 top value=4k75
R91 "0201" R0201 139.578,184.854 r90 top value=47k
R92 "0201" R0201 145.42,184.854 r90 top value=47k
R93 "0201" R0201 151.262,184.854 r90 top value=47k
R94 "0201" R0201 116.083,184.854 r90 top value=47k
R95 "0201" R0201 122.052,184.854 r90 top value=47k
R96 "0201" R0201 127.894,184.854 r90 top value=47k
R97 "0201" R0201 40.488,15.824 r180 bottom value=33R
R98 "0201" R0201 40.132,14.478 r180 bottom value=33R
R99 "0201" R0201 308.361,52.901 r90 top value=10k
R100 "0201" R0201 314.203,52.901 r90 top value=2k2
R101 "0201" R0201 320.045,52.901 r90 top value=1k
R102 "0201" R0201 39.167,10.211 r180 bottom value=10k
R103 "0201" R0201 267.213,52.901 r90 top value=2k2
R104 "0201" R0201 272.547,52.901 r90 top value=1k
R105 "0201" R0201 278.389,52.901 r90 top value=240R
R106 "0201" R0201 110.241,52.901 r90 top value=1k
R107 "0201" R0201 98.557,52.901 r90 top value=1k
R108 "0201" R0201 292.232,70.935 r90 top value=47k
R109 "0201" R0201 298.074,70.935 r90 top value=47k
R110 "0201" R0201 303.916,70.935 r90 top value=47k
R111 "0201" R0201 309.758,70.935 r90 top value=47k
R112 "0201" R0201 315.6,70.935 r90 top value=47k
R113 "0201" R0201 321.442,70.935 r90 top value=47k
R114 "0201" R0201 326.776,70.935 r90 top value=47k
R115 "0201" R0201 332.618,70.935 r90 top value=47k
R116 "0201" R0201 338.46,70.935 r90 top value=47k
R117 "0201" R0201 344.302,70.935 r90 top value=10k
R118 "0201" R0201 201.554,70.935 r90 top value=22R
R119 "0201" R0201 182.758,70.935 r90 top value=10k
R120 "0201" R0201 188.6,70.935 r90 top value=10k
R121 "0201" R0201 117.607,70.935 r90 top value=47k
R122 "0201" R0201 123.449,70.935 r90 top value=47k
R123 "0201" R0201 129.291,70.935 r90 top value=47k
R124 "0201" R0201 136.403,70.935 r90 top value=47k
R125 "0201" R0201 143.007,70.935 r90 top value=10k
R126 "0201" R0201 150.119,70.935 r90 top value=10k
R127 "0201" R0201 102.875,70.935 r90 top value=22R
R128 "0201" R0201 81.539,70.935 r90 top value=10k
R129 "0201" R0201 169.423,128.974 r90 top value=10k
R130 "0201" R0201 176.281,128.974 r90 top value=47k
R131 "0201" R0201 183.139,128.974 r90 top value=47k
R132 "0201" R0201 189.997,128.974 r90 top value=47k
R133 "0201" R0201 196.855,128.974 r90 top value=47k
R134 "0201" R0201 203.713,128.974 r90 top value=47k
R135 "0201" R0201 142.626,128.974 r90 top value=22R
R136 "0201" R0201 135.895,128.974 r90 top value=10k
R137 "0201" R0201 108.59,128.974 r90 top value=10k
R138 "0201" R0201 134.371,34.486 r90 top value=0R
R139 "0201" R0201 108.971,34.486 r90 top value=22R
R140 "0201" R0201 116.083,34.486 r90 top value=22R
R141 "0201" R0201 101.859,34.486 r90 top value=22R
R142 "0201" R0201 94.747,34.486 r90 top value=22R
R143 "0201" R0201 95.377,29.083 r90 top value=22R
R144 "0201" R0201 92.964,31.242 r90 top value=0R
R145 "0201" R0201 81.539,146.754 r90 top value=240R
R146 "0201" R0201 89.916,39.095 r90 top value=499R
R147 "0201" R0201 121.163,25.977 r90 top value=1k
R148 "0201" R0201 125.481,25.977 r90 top value=1k
R149 "0201" R0201 129.799,25.977 r90 top value=1k
R150 "0201" R0201 86.619,2.736 r90 top value=1k
R151 "0201" R0201 138.435,25.977 r90 top value=1k
R152 "0201" R0201 142.753,25.977 r90 top value=1k
R153 "0201" R0201 147.071,25.977 r90 top value=1k
R154 "0201" R0201 151.516,25.977 r90 top value=1k
R155 "0201" R0201 113.924,6.927 r90 top value=499R
R156 "0201" R0201 96.901,13.822 r90 top value=499R
R157 "0201" R0201 86.619,25.977 r90 top value=47k
R158 "0201" R0201 90.937,25.977 r90 top value=47k
R159 "0201" R0201 95.255,25.977 r90 top value=47k
R160 "0201" R0201 99.573,25.977 r90 top value=47k
R161 "0201" R0201 103.891,25.977 r90 top value=47k
R162 "0201" R0201 108.209,25.977 r90 top value=47k
R163 "0201" R0201 112.527,25.977 r90 top value=47k
R164 "0201" R0201 116.845,25.977 r90 top value=47k
R165 "0201" R0201 270.896,18.611 r90 top value=10k
R166 "0201" R0201 278.008,18.611 r90 top value=10k
R167 "0201" R0201 285.12,18.611 r90 top value=10k
R168 "0201" R0201 251.084,18.611 r90 top value=22R
R169 "0201" R0201 116.845,2.736 r90 top value=22R
R170 "0201" R0201 112.527,2.736 r90 top value=22R
R171 "0201" R0201 108.209,2.736 r90 top value=22R
R172 "0201" R0201 103.891,2.736 r90 top value=22R
R173 "0201" R0201 99.573,2.736 r90 top value=22R
R174 "0201" R0201 95.255,2.736 r90 top value=22R
R175 "0201" R0201 90.937,2.736 r90 top value=22R
R176 "0201" R0201 86.619,2.736 r90 top value=22R
R177 "0201" R0201 243.972,18.611 r90 top value=10k
R178 "0201" R0201 223.144,18.611 r90 top value=10k
R179 "0201" R0201 230.256,18.611 r90 top value=10k
R180 "0201" R0201 237.368,18.611 r90 top value=4k3
R181 "0201" R0201 100.843,3.117 r90 top value=10k
R182 "0201" R0201 113.162,34.74 r0 top value=3k48
R183 "0201" R0201 91.826,34.74 r0 top value=10k
R184 "0201" R0201 185.298,5.149 r90 top value=16k5
R185 "0201" R0201 164.724,5.149 r90 top value=10k
R186 "0201" R0201 157.612,5.149 r90 top value=10k
R187 "0201" R0201 116.845,34.613 r90 top value=5k1
R188 "0201" R0201 121.163,34.613 r90 top value=5k1
R189 "0201" R0201 144.023,5.149 r90 top value=3k48
R190 "0402" R0402 137.165,4.768 r90 top value=0R
R191 "0201" R0201 122.687,5.149 r90 top value=10k
R192 "0201" R0201 129.799,5.149 r90 top value=16k5
R193 "0201" R0201 93.731,5.149 r90 top value=10k
R194 "0201" R0201 86.619,5.149 r90 top value=10k
R195 "0402" R0402 130.688,34.74 r0 top value=0R
R196 "0201" R0201 175.265,20.262 r90 top value=1k
R197 "0201" R0201 179.583,20.262 r90 top value=1k
R198 "0201" R0201 183.901,20.262 r90 top value=1k
R199 "0201" R0201 188.219,20.262 r90 top value=1k
R200 "0201" R0201 192.537,20.262 r90 top value=1k
R201 "0201" R0201 196.855,20.262 r90 top value=1k
R202 "0201" R0201 201.173,20.262 r90 top value=1k
R203 "0201" R0201 205.618,20.262 r90 top value=1k
R204 "0201" R0201 131.958,20.262 r90 top value=47k
R205 "0201" R0201 136.276,20.262 r90 top value=47k
R206 "0201" R0201 140.594,20.262 r90 top value=47k
R207 "0201" R0201 144.912,20.262 r90 top value=47k
R208 "0201" R0201 149.23,20.262 r90 top value=47k
R209 "0201" R0201 153.548,20.262 r90 top value=47k
R210 "0201" R0201 157.993,20.262 r90 top value=47k
R211 "0201" R0201 162.311,20.262 r90 top value=47k
R212 "0201" R0201 128.783,3.244 r90 top value=1M
R213 "0201" R0201 135.895,3.244 r90 top value=10k
R214 "0201" R0201 106.939,3.244 r90 top value=387k
R215 "0201" R0201 99.827,3.244 r90 top value=387k
SW2 "218-4LPSTJR" SW_DIP_SPSTx04_Slide 60.935,46.203 r0 top
TP1 "Testpoint 0.5mm" TP_0.50mm 98.303,1.872 r90 top
TP2 "Testpoint 0.5mm" TP_0.50mm 92.461,1.872 r90 top
TP3 "Testpoint 0.5mm" TP_0.50mm 86.619,1.872 r90 top
TP4 "Testpoint 0.5mm" TP_0.50mm 92.461,16.046 r90 top
TP5 "Testpoint 0.5mm" TP_0.50mm 98.303,16.046 r90 top
TP6 "Testpoint 0.5mm" TP_0.50mm 86.619,16.046 r90 top
TP7 "Testpoint 0.5mm" TP_0.50mm 249.56,30.219 r90 top
TP8 "Testpoint 0.5mm" TP_0.50mm 243.718,30.219 r90 top
TP9 "Testpoint 0.5mm" TP_0.50mm 230.739,30.219 r90 top
TP10 "Testpoint 0.5mm" TP_0.50mm 236.581,30.219 r90 top
TP11 "Testpoint 0.5mm" TP_0.50mm 217.023,30.219 r90 top
TP12 "Testpoint 0.5mm" TP_0.50mm 223.627,30.219 r90 top
TP13 "Testpoint 0.5mm" TP_0.50mm 202.773,30.219 r90 top
TP14 "Testpoint 0.5mm" TP_0.50mm 209.885,30.219 r90 top
TP15 "Testpoint 0.5mm" TP_0.50mm 195.661,30.219 r90 top
TP16 "Testpoint 0.5mm" TP_0.50mm 188.549,30.219 r90 top
TP17 "Testpoint 0.5mm" TP_0.50mm 167.188,30.219 r90 top
TP18 "Testpoint 0.5mm" TP_0.50mm 174.3,30.219 r90 top
TP19 "Testpoint 0.5mm" TP_0.50mm 181.412,30.219 r90 top
TP20 "Testpoint 0.5mm" TP_0.50mm 138.206,30.219 r90 top
TP21 "Testpoint 0.5mm" TP_0.50mm 145.572,30.219 r90 top
TP22 "Testpoint 0.5mm" TP_0.50mm 152.456,30.219 r90 top
TP23 "Testpoint 0.5mm" TP_0.50mm 159.822,30.219 r90 top
TP24 "Testpoint 0.5mm" TP_0.50mm 130.84,30.219 r90 top
TP25 "Testpoint 0.5mm" TP_0.50mm 123.474,30.219 r90 top
TP26 "Testpoint 0.5mm" TP_0.50mm 116.083,30.219 r90 top
TP27 "Testpoint 0.5mm" TP_0.50mm 108.717,30.219 r90 top
TP28 "Testpoint 0.5mm" TP_0.50mm 91.237,30.556 r90 top
TP29 "Testpoint 0.5mm" TP_0.50mm 93.985,30.219 r90 top
TP30 "Testpoint 0.5mm" TP_0.50mm 101.351,30.219 r90 top
TP31 "Testpoint 0.5mm" TP_0.50mm 174.554,39.668 r90 top
TP32 "Testpoint 0.5mm" TP_0.50mm 167.188,39.668 r90 top
TP33 "Testpoint 0.5mm" TP_0.50mm 159.822,39.668 r90 top
TP34 "Testpoint 0.5mm" TP_0.50mm 152.456,39.668 r90 top
TP35 "Testpoint 0.5mm" TP_0.50mm 145.064,39.668 r90 top
TP36 "Testpoint 0.5mm" TP_0.50mm 137.698,39.668 r90 top
TP37 "Testpoint 0.5mm" TP_0.50mm 130.332,39.668 r90 top
TP38 "Testpoint 0.5mm" TP_0.50mm 115.575,39.668 r90 top
TP39 "Testpoint 0.5mm" TP_0.50mm 122.966,39.668 r90 top
TP40 "Testpoint 0.5mm" TP_0.50mm 108.209,39.668 r90 top
TP41 "Testpoint 0.5mm" TP_0.50mm 101.351,39.668 r90 top
TP42 "Testpoint 0.5mm" TP_0.50mm 93.985,39.668 r90 top
TP43 "Testpoint 0.5mm" TP_0.50mm 91.77,40.081 r90 top
TP44 "Testpoint 0.5mm" TP_0.50mm 86.619,11.321 r90 top
TP45 "Testpoint 0.5mm" TP_0.50mm 93.985,25.494 r90 top
TP46 "Testpoint 0.5mm" TP_0.50mm 86.619,25.494 r90 top
TP47 "Testpoint 0.5mm" TP_0.50mm 93.985,6.597 r90 top
TP48 "Testpoint 0.5mm" TP_0.50mm 86.619,6.597 r90 top
TP49 "Testpoint 0.5mm" TP_0.50mm 100.843,20.77 r90 top
TP50 "Testpoint 0.5mm" TP_0.50mm 86.619,20.77 r90 top
TP51 "Testpoint 0.5mm" TP_0.50mm 93.985,20.77 r90 top
TP52 "Testpoint 0.5mm" TP_0.50mm 108.717,34.943 r90 top
TP53 "Testpoint 0.5mm" TP_0.50mm 101.351,34.943 r90 top
TP54 "Testpoint 0.5mm" TP_0.50mm 92.329,34.671 r90 top
TP55 "Testpoint 0.5mm" TP_0.50mm 93.985,34.943 r90 top
U1 "NAU88C22YG" VQFN-32-1EP_5X5MM_P0.5MM_EP3.5X3.5MM 23.839,31.619 r90 top
U2 "FT4232H" LQFP-64_10x10mm_P0.5mm 24.119,20.61 r90 bottom
U4 "LAN8840" QFN-48-1EP_7X7MM_P0.5MM_EP5.15X5.15MM 59.428,36.834 r180 top
U5 "TLV743P" SOT-23-5 63.881,25.781 r0 top value=TLV74311PDBVR
U6 "AP61300" SOT563 223.647,2.794 r0 top
U7 "AP61300" SOT563 73.533,6.096 r0 top
U8 "TPS6521901" QFN-32-1EP_5X5MM_P0.5MM_EP3.7X3.7MM 11.458,13.425 r90 top
U9 "LBEE5PK2AE-564" LBEE5PK2AE-564 14.986,42.783 r180 top
U10 "K4AAG165WA-BCWE" FBGA-96_8X14MM_LAYOUT9X16_P0.8MM 39,13 r90 top
U11 "KLMBG2JETD-B041" LFBGA-153_11.5X13MM_LAYOUT14X14_P0.5MM 56.748,13.793 r0 top
U12 "IS25WP128-RHLE" IS25WP128-RHLE 30.385,47.784 r90 top
U13 "SN74AXC4T774RSVR" UQFN-16_1.8x2.6mm_P0.4mm 14.297,30.665 r0 top
U14 "SN74AXC4T774RSVR" UQFN-16_1.8x2.6mm_P0.4mm 9.437,30.553 r0 top
U15 "SN74AXC4T774RSVR" UQFN-16_1.8x2.6mm_P0.4mm 2.686,30.478 r0 top
U16 "SN74AXC4T774RSVR" UQFN-16_1.8x2.6mm_P0.4mm 6.516,30.515 r0 top
U17 "TPS22918" SOT-23-6 23.749,45.466 r0 top value=TPS22918DBVR
U18 "AM6254ATCGHAALW" AM6254ATCGHAALW 43,31 r90 top locked
U19 "SY75714" TDFN-8-2x2mm_P0.5mm 4.826,34.036 r0 top
U20 "SiI9022ACNU" QFN-72-1EP_10X10MM_P0.5MM_EP4.7X4.7MM 45.481,48.097 r90 bottom
U21 "AP2151WG-7" SOT-23-5 19.685,11.43 r0 top
U22 "AP2151WG-7" SOT-23-5 60.198,2.667 r0 top
U23 "TPS259531" TPS259531 88.016,2.609 r0 top
Y2 "ECS-2520MV" OSCILLATOR_SMD_ECS_2520MV-XXX-XX-4PIN_2.5X2.0MM 8.636,33.909 r0 top value=25MHz

## Footprints (in the part's own frame and the unit in brackets; to place one, negate y for a bottom-side part, rotate by r counter-clockwise, add the part's x,y. Pads: shape width x height; smd on the part's side, far side on the other; paste and mask are expansions set on the pad)
2450AD14A5500001T [mm]
  rect 0.165x0.63 smd: 1(0.633,0) 3(-0.633,0)
  rect 0.4x0.21 smd: 2(0,0.21) 4(0,-0.21)
  L1(SIG) region: 0.45,-0.405 0.95,-0.405 0.95,-0.255 6.75,-0.255 6.75,0.395 0.45,0.395
  L1(SIG) region: -0.3,0.105 -0.3,0.395 0.3,0.395 0.3,0.105
  L1(SIG) region: -0.3,-4.355 0.3,-4.355 0.3,-0.105 -0.3,-0.105
  L1(SIG) region: -0.95,-3.105 -0.95,0.395 -0.45,0.395 -0.45,-3.105
  L8(SIG) region: 0.95,-0.255 0.95,0.395 6.61,0.395 6.61,-0.255
  body extent -0.8,-0.4 0.8,0.4, height 0.41
5019512230 [mm]
  rect 0.6x1.2 smd: 1(-5.25,-1.704) 2(-4.75,1.196) 3(-4.25,-1.704) 4(-3.75,1.196) 5(-3.25,-1.704) 6(-2.75,1.196) 7(-2.25,-1.704) 8(-1.75,1.196) 9(-1.25,-1.704) 10(-0.75,1.196) 11(-0.25,-1.704) 12(0.25,1.196) 13(0.75,-1.704) 14(1.25,1.196) 15(1.75,-1.704) 16(2.25,1.196) 17(2.75,-1.704) 18(3.25,1.196) 19(3.75,-1.704) 20(4.25,1.196) 21(4.75,-1.704) 22(5.25,1.196)
  rect 0.8x1.4 smd: SH(-6.25,-1.604) SH(-6.25,1.096) SH(6.25,-1.604) SH(6.25,1.096)
  silkscreen extent -5.36,-3.2 -5.06,-2.9, body extent -6.9,-2.41 6.9,1.72, height 4.61